# Altium PCB CPJ.PcbDoc (part 1 of 2)
Units mm, origin at the board's own origin, x right, y up, seen from the top; angles counter-clockwise.
Board outline 210 x 60 mm, 4 copper layers (Top Layer, Inner_1, PWR_SIG, Bottom Layer), stack 1.63 mm thick; 123 components, 76 nets, 368 pads, 236 vias.
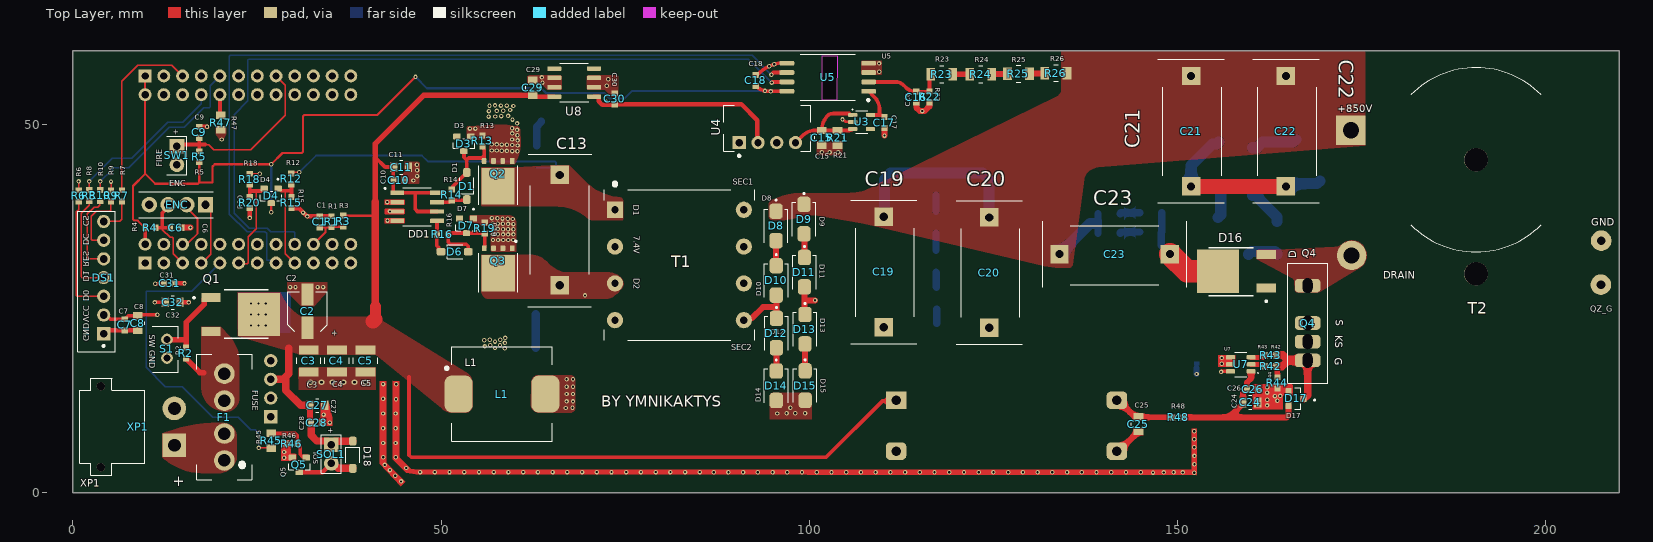
[diagram p0: Top Layer view]
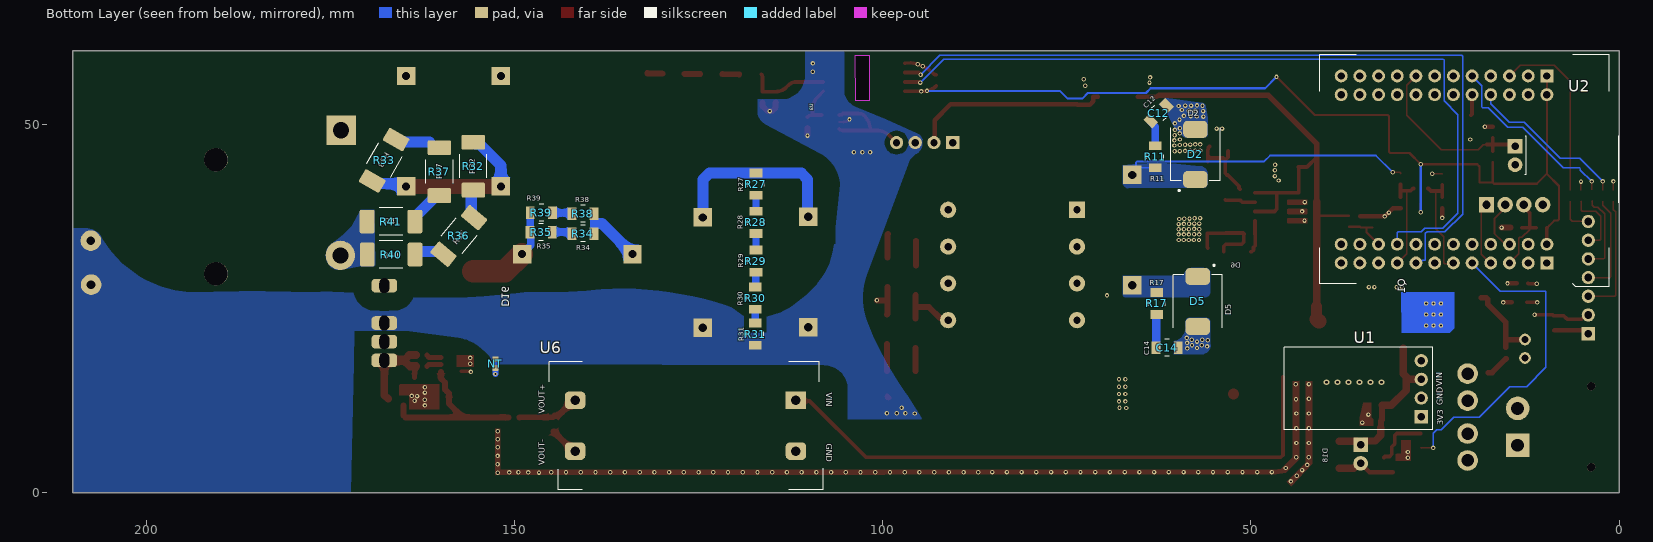
[diagram p1: Bottom Layer view, seen from below]
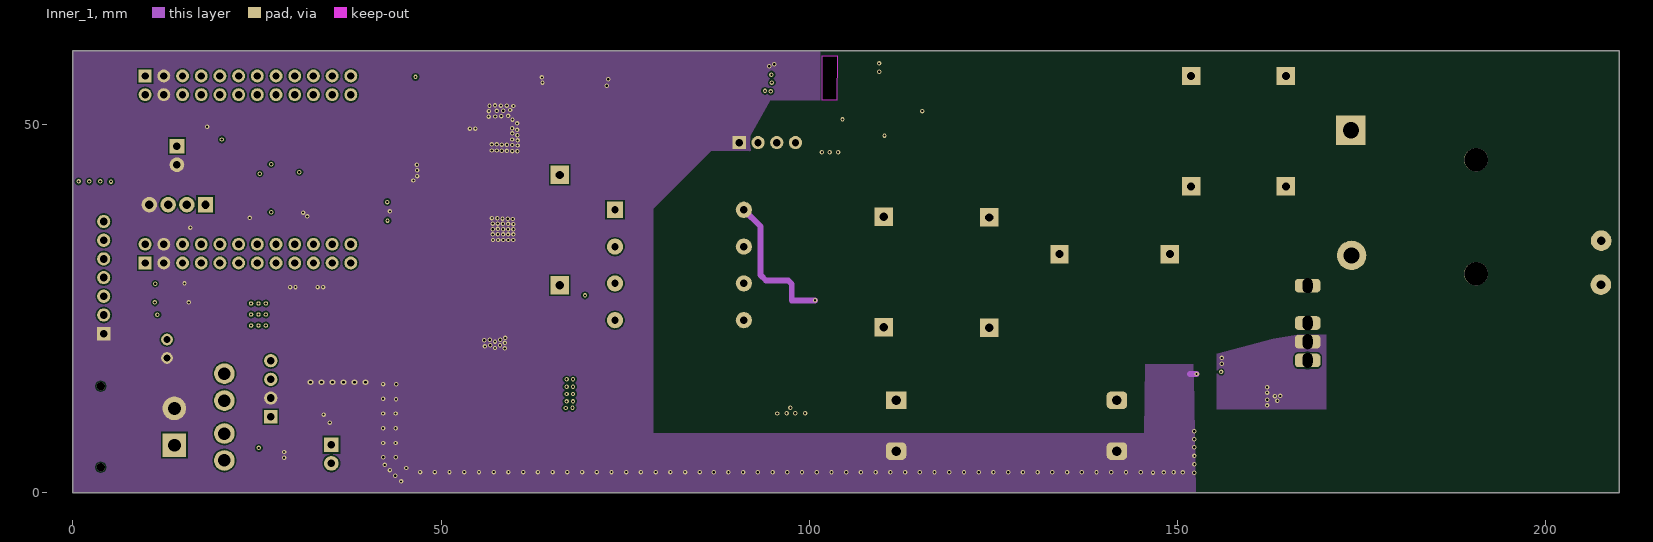
[diagram p2: Inner_1]
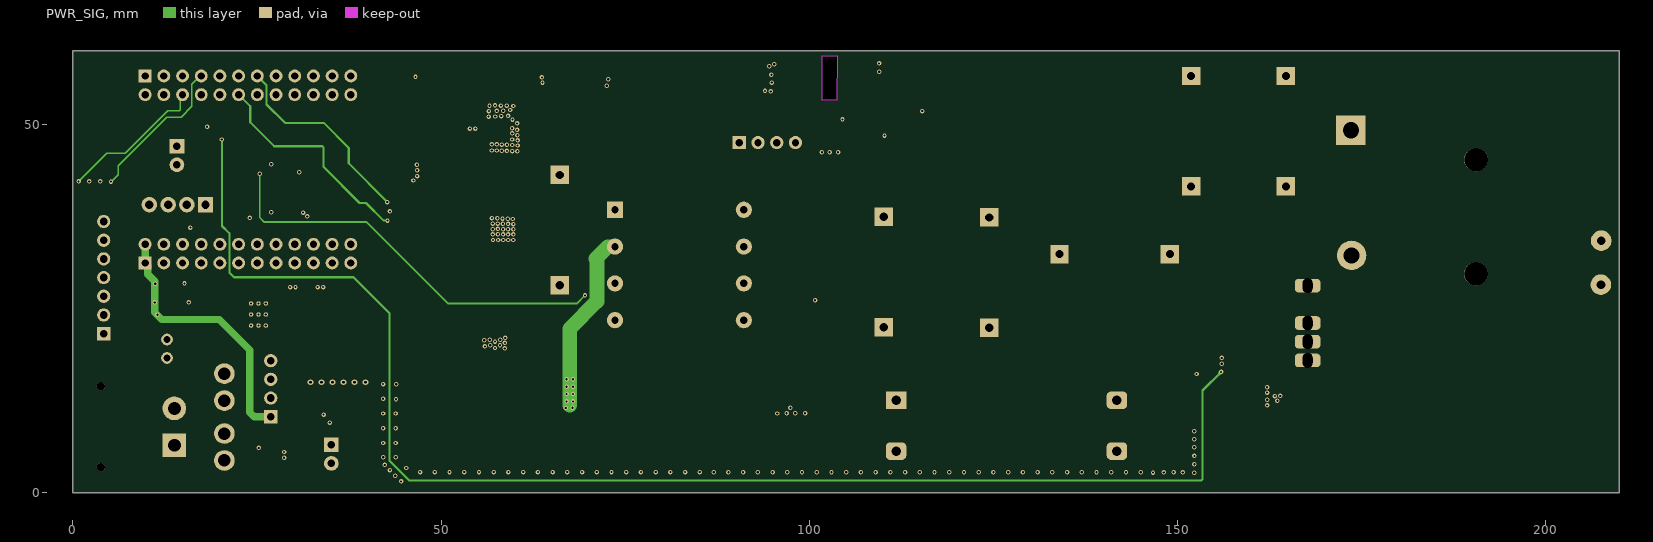
[diagram p3: PWR_SIG]
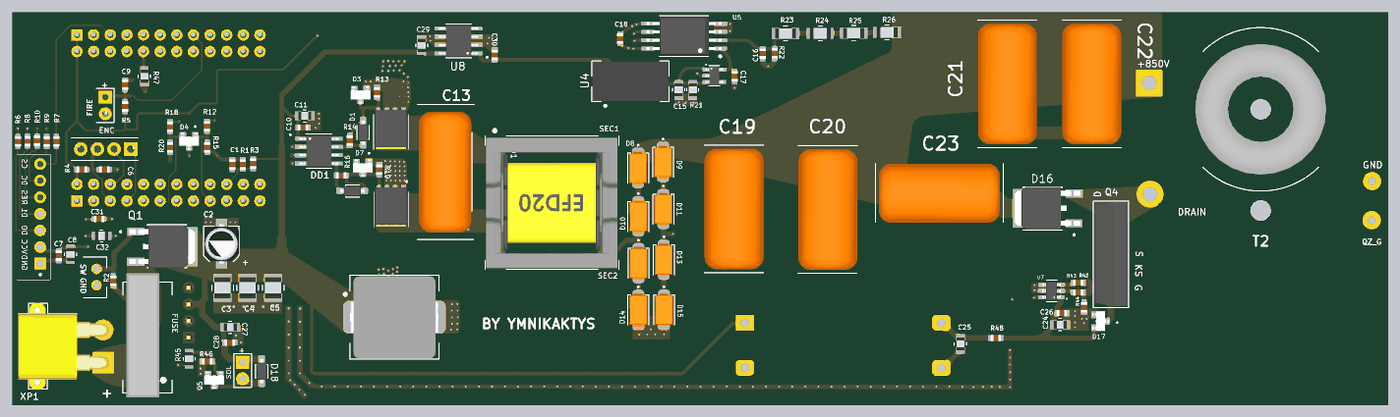
[diagram p5: 3D render of the assembled board from above, using the file's embedded part models]
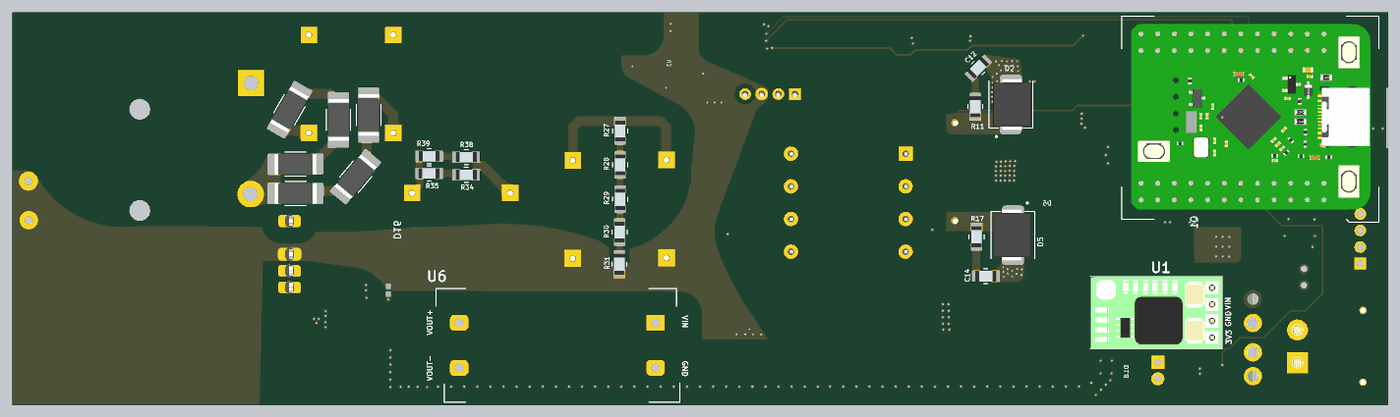
[diagram p6: 3D render of the assembled board from below, using the file's embedded part models]

## Layer stack, top to bottom
Top Solder: solder mask 0.0102, Solder Resist, Dk 3.5
Top Layer: signal copper 0.0356
Dielectric 1: prepreg 0.2108, PP-006, Dk 4.1
Inner_1: signal copper 0.035
Dielectric 2: dielectric 1.0668, FR-4, Dk 4.8
PWR_SIG: signal copper 0.035
Dielectric 3: prepreg 0.2108, PP-006, Dk 4.1
Bottom Layer: signal copper 0.0356
Bottom Solder: solder mask 0.0102, Solder Resist, Dk 3.5

## Board outline
0,0 210,0 210,60 0,60
cut-out: 101.76,59.375 103.805,59.375 103.748,53.325 101.76,53.325

## Design rules (kind name [scope] priority, off if disabled: settings)
Clearance Clearance_REST_TO_HVGND [InNet('NetR30_1') or InComponent('U4') vs InNet('HV_GND')] p1: gap=0.7 ignorepadtopadclearanceinfootprint=FALSE
Clearance Clearance_HV_Pulse_7kV [InNet('HV_OUT')] p2: gap=8 ignorepadtopadclearanceinfootprint=TRUE
Clearance Clearance_HV_Divider [InComponent('R23') Or InComponent('R24') Or InComponent('R25') Or InComponent('R26') vs InComponent('R23') Or InComponent('R24') Or InComponent('R25') Or InComponent('R26')] p3: gap=0.8 ignorepadtopadclearanceinfootprint=FALSE
Clearance Clearance_SiC_Gate_Loop [InNet('SIC_GATE') vs InNet('VBAT') OR InNet('VBAT_SW') OR InNet('ZVS_DRAIN1') OR InNet('ZVS_DRAIN2')] p4: gap=1.5 ignorepadtopadclearanceinfootprint=FALSE
Clearance Clearance_HV_DC_Internal [InNet('HV_BUS') OR InNet('SIC_DRAIN') vs InNet('HV_GND') OR (InPolygon AND NOT InNet('HV_BUS'))] p5: gap=2.5 ignorepadtopadclearanceinfootprint=FALSE
Clearance Clearance_HV_to_LV_Barrier [InNet('GND') OR InNet('VBAT_RAW') OR InNet('VBAT_SW') vs InNet('HV_BUS') OR InNet('SIC_DRAIN')] p6: gap=6 ignorepadtopadclearanceinfootprint=TRUE
Clearance [All] p7: gap=0.2 ignorepadtopadclearanceinfootprint=TRUE
ComponentClearance [All] p1: gap=0.1 collisioncheckmode=3 verticalgap=0.1 showdistances=TRUE
HoleSize [All] p1: absolutevalues=TRUE maxlimit=3.5 minlimit=0.025 maxpercent=80.000 minpercent=20.000
MinimumSolderMaskSliver [All] p1: minsoldermaskwidth=0.1
PolygonConnect PolygonConnect_Direct [InNet('HV_BUS') OR InNet('HV_GND') OR InNet('SIC_DRAIN') OR InNet('ZVS_DRAIN1') OR InNet('ZVS_DRAIN2') OR InNet('VBAT') OR InNet('VBAT_SW') OR InNet('SIC_KELVIN') OR InNet('SIC_GATE')] p1: connectstyle=Direct reliefconductorwidth=0.254 reliefentries=4 polygonreliefangle="90 Angle" airgapwidth=0.254
PolygonConnect PolygonConnect_Thermal [IsThruPin] p2: connectstyle=Relief reliefconductorwidth=0.5 reliefentries=4 polygonreliefangle="90 Angle" airgapwidth=0.3
PolygonConnect [All] p3: connectstyle=Relief reliefconductorwidth=0.254 reliefentries=4 polygonreliefangle="90 Angle" airgapwidth=0.254
RoutingVias RoutingVias_Power [InNetClass('PWR_BAT') or InNet('GND') or InNet('HV_GND')] p1: holewidth=0.4 width=0.8 viastyle="Through Hole" minholewidth=0.3 minwidth=0.6 maxholewidth=0.5 maxwidth=1
RoutingVias [All] p2: holewidth=0.3 width=0.5 viastyle="Through Hole" minholewidth=0.3 minwidth=0.5 maxholewidth=0.5 maxwidth=0.8
ShortCircuit [InComponent('NT*')] p1: allowed=TRUE
SilkToSolderMaskClearance [IsPad] p1: minsilkscreentomaskgap=0.15 clearancetoexposedcopper=TRUE
SolderMaskExpansion [All] p1: expansion=0.05 istentingtop=FALSE
SupplyNets "Schematic Supply Nets_4" [InNet('+3V3')] p1: voltage=0.000
SupplyNets "Schematic Supply Nets_3" [InNet('VBAT_SW')] p2: voltage=0.000
SupplyNets "Schematic Supply Nets_2" [InNet('HV_GND')] p3: voltage=0.000
SupplyNets "Schematic Supply Nets_1" [InNet('GND')] p4: voltage=0.000
SupplyNets "Schematic Supply Nets" [InNet('HV_BUS')] p5: voltage=0.000
Width Width_SiC_Gate [InNetClass('SIC_GATE')] p1: maxlimit=1.2 minlimit=0.4 preferedwidth=0.6
Width Width_3V3_Logic_PWR [InNet('+3V3') or InNet('+15V_SIC')] p2: maxlimit=1 minlimit=0.3 preferedwidth=0.5
Width Width_ZVS_Resonant [InNetClass('ZVS_RESONANT')] p3: maxlimit=15 minlimit=3 preferedwidth=4.5
Width Width_PWR_Battery [InNetClass('PWR_BAT')] p4: maxlimit=5 minlimit=2 preferedwidth=3
Width [All] p5: maxlimit=10 minlimit=0.15 preferedwidth=1
25 further rules are at their usual default settings.

## Classes and differential pairs
component class 06_Pneumatics: C27 C28 D18 Q5 R45 R46 SOL1
component class 05_SiC_Nanosecond_Stage: C21 C22 C23 C24 C25 C26 D16 D17 NT Q4 R32 R33 R34 R35 R36 R37 R38 R39 R40 R41 R42 R43 R44 R47 R48 T2 U6 U7
component class 04_HV_Bus_Sense: C15 C16 C17 C18 C19 C20 C29 C30 D8 D9 D10 D11 D12 D13 D14 D15 R21 R22 R23 R24 R25 R26 R27 R28 R29 R30 R31 U3 U4 U5 U8
component class 03_ZVS_PushPull: C10 C11 C12 C13 C14 D1 D2 D3 D4 D5 D6 D7 DD1 L1 Q2 Q3 R11 R12 R13 R14 R15 R16 R17 R18 R19 R20 T1
component class 02_MCU_Control_UI: C6 C7 C8 C9 C31 C32 DS1 ENC R4 R5 R6 R7 R8 R9 R10 SW1 U2
component class 01_Power_Input: C1 C2 C3 C4 C5 F1 Q1 R1 R2 R3 S1 U1 XP1

## Components (designator, comment, footprint, x,y, rotation, side; value= is the part's Value field where it differs from the comment)
C1 "100nF" CHIP_0603_SMD 33.525,36.775 r90 top
C2 "100uF 16V" CAP_ALU_SMD_D5.0_L5.4 31.85,24.6 r90 top
C3 "22uF 25V" CHIP_1210_3225 32.025,17.9 r90 top
C4 "22uF 25V" CHIP_1210_3225 35.85,17.9 r90 top
C5 "22uF 25V" CHIP_1210_3225 39.75,17.9 r90 top
C6 "100nF" CHIP_0603_SMD 13.975,36 r180 top
C7 "100nF" CHIP_0603_SMD 7.025,22.8 r270 top
C8 "10uF" CHIP_0805_SMD 8.8,23.025 r270 top
C9 "100nF" CHIP_0603_SMD 17.15,48.95 r270 top
C10 "100nF" CHIP_0603_SMD 44.275,42.425 r180 top
C11 "2.2uF 25V" CHIP_0805_SMD 44.575,44.225 r180 top
C12 "2.2nF 100V" CHIP_1206_SMD 62.55,51.55 r315 bottom
C13 "220nF 100V" CAP_FILM_P15.0_CBB22_W8.5_MKP 66.125,35.675 r90 top
C14 "2.2nF 100V" CHIP_1206_SMD 61.375,19.675 r0 bottom
C15 "4.7uF 16V" CHIP_0805_SMD 101.7,48.2 r90 top
C16 "1nF 50V NP0" CHIP_0603_SMD 114.525,53.725 r270 top
C17 "100nF" CHIP_0603_SMD 110.225,50.275 r90 top
C18 "100nF" CHIP_0603_SMD 92.75,56 r270 top
C19 "1nF 2000V" CAP_FILM_P15.0_CBB81_HEAVY_DUTY 110.125,29.975 r90 top
C20 "1nF 2000V" CAP_FILM_P15.0_CBB81_HEAVY_DUTY 124.45,29.9 r90 top
C21 "470pF 2kV" CAP_FILM_P15.0_CBB81_HEAVY_DUTY 151.875,49.1 r90 top
C22 "330pF 2kV" CAP_FILM_P15.0_CBB81_HEAVY_DUTY 164.75,49.1 r90 top
C23 "3.3nF 2000V" CAP_FILM_P15.0_CBB81_HEAVY_DUTY 141.5,32.4 r0 top
C24 "2.2uF 25V" CHIP_0805_SMD 159.925,12.25 r0 top
C25 "10uF" CHIP_0805_SMD 144.725,9.325 r90 top
C26 "100nF" CHIP_0603_SMD 160.225,14.025 r0 top
C27 "10uF" CHIP_0805_SMD 33.2,11.875 r180 top
C28 "100nF" CHIP_0603_SMD 33.1,9.5 r180 top
C29 "2.2uF 25V" CHIP_0805_SMD 62.425,55 r270 top
C30 "100nF" CHIP_0603_SMD 73.6,53.5 r270 top
C31 "100nF" CHIP_0603_SMD 13.125,28.425 r180 top
C32 "10uF" CHIP_0805_SMD 13.55,25.85 r180 top
D1 "1N5819HW" SOD-123_2P_SMD 53.5,41.65 r90 top
D2 "39V 1.5kW" DIODE_DO-214AB_SMC 57.55,45.95 r90 bottom
D3 "BZX84-C15" SOT-23_3P_SMD 53.1,47.4 r180 top
D4 "BAT54C" SOT-23_3P_SMD 26.925,40.325 r180 top
D5 "39V 1.5kW" DIODE_DO-214AB_SMC 57.225,25.975 r270 bottom
D6 "1N5819HW" SOD-123_2P_SMD 51.85,32.725 r0 top
D7 "BZX84-C15" SOT-23_3P_SMD 53.45,36.25 r180 top
D8 "US2M" DIODE_DO-214AC_SMA 95.5,36.225 r270 top
D9 "US2M" DIODE_DO-214AC_SMA 99.3,37.15 r270 top
D10 "US2M" DIODE_DO-214AC_SMA 95.525,28.825 r270 top
D11 "US2M" DIODE_DO-214AC_SMA 99.35,29.95 r270 top
D12 "US2M" DIODE_DO-214AC_SMA 95.55,21.675 r270 top
D13 "US2M" DIODE_DO-214AC_SMA 99.425,22.2 r270 top
D14 "US2M" DIODE_DO-214AC_SMA 95.525,14.525 r270 top
D15 "US2M" DIODE_DO-214AC_SMA 99.45,14.55 r270 top
D16 "C4D02120E" TO-252-2L_DPAK_THERMAL#1 158.025,30.075 r90 top
D17 "BAT54S" SOT-23_3P_SMD 166.125,12.8 r270 top
D18 "1N5819HW" SOD-123_2P_SMD 38.025,5.15 r270 top
DD1 "UCC27524DR" SOIC-8_1.27_4.9x3.9mm 46.75,38.825 r0 top
DS1 "OLED_0.96_SPI_7PIN" DISP_OLED_0.96_SSD1306_SPI_7PIN_THT 4.175,29.215 r90 top
ENC "EC11" ENC_EC11_VERTICAL_THT 12.925,39.125 r180 top
F1 "20A 32V" FUSE_HOLDER_MINI_KEYSTONE_3544 20.575,10.275 r90 top
L1 "22uH 12A" IND_SRP1265A_13.5x12.5_HANDSOLDER 58.275,13.4 r0 top
NT "net_tie" NET_TIE_SMD 152.625,17.525 r270 bottom net-tie
Q1 "AOD4185" TO-252-2L_DPAK_THERMAL#2 22.8,24.2 r270 top
Q2 "CSD18534Q5A" SON-8_5x6_CSD18534Q5A_THERMAL 57.75,42.3 r90 top
Q3 "CSD18534Q5A" SON-8_5x6_CSD18534Q5A_THERMAL 57.76,30.45 r90 top
Q4 "C3M0075120K" TO-247-4_WOLFSPEED_SLOTTED_VERT 167.7,23.045 r270 top
Q5 "AO3400A" SOT-23_3P_SMD 30.75,3.775 r180 top
R1 "47.5k" CHIP_0603_SMD 35.125,36.8 r90 top
R2 "100k" CHIP_0603_SMD 15.35,18.95 r270 top
R3 "100k" CHIP_0603_SMD 36.7,36.875 r270 top
R4 "10k" CHIP_0603_SMD 10.5,36 r180 top
R5 "10k" CHIP_0603_SMD 17.15,45.625 r270 top
R6 "33R" CHIP_0603_SMD 0.775,40.325 r90 top
R7 "33R" CHIP_0603_SMD 6.65,40.325 r90 top
R8 "33R" CHIP_0603_SMD 2.225,40.35 r90 top
R9 "33R" CHIP_0603_SMD 5.175,40.3 r90 top
R10 "33R" CHIP_0603_SMD 3.7,40.375 r270 top
R11 "5.62" CHIP_1206_SMD 62.975,45.625 r270 bottom
R12 "10k" CHIP_0603_SMD 29.65,42.625 r90 top
R13 "10k" CHIP_0603_SMD 55.625,47.775 r270 top
R14 "4.7" CHIP_0603_SMD 51.45,40.45 r90 top
R15 "1k" CHIP_0603_SMD 29.675,39.4 r90 top
R16 "4.7" CHIP_0603_SMD 50.175,35.1 r0 top
R17 "5.62" CHIP_1206_SMD 62.775,25.7 r90 bottom
R18 "10k" CHIP_0603_SMD 24.025,42.575 r90 top
R19 "10k" CHIP_0603_SMD 55.95,35.95 r270 top
R20 "1k" CHIP_0603_SMD 24.025,39.4 r90 top
R21 "300" CHIP_0805_SMD 103.85,48.2 r90 top
R22 "3.9k" CHIP_0603_SMD 116.35,53.75 r270 top
R23 "510k" CHIP_1206_SMD 118,56.825 r180 top
R24 "510k" CHIP_1206_SMD 123.3,56.85 r180 top
R25 "510k" CHIP_1206_SMD 128.425,56.9 r180 top
R26 "510k" CHIP_1206_SMD 133.5,57 r180 top
R27 "3.9M" CHIP_1206_SMD 117.225,41.9 r90 bottom
R28 "3.9M" CHIP_1206_SMD 117.225,36.725 r90 bottom
R29 "3.9M" CHIP_1206_SMD 117.225,31.45 r90 bottom
R30 "3.9M" CHIP_1206_SMD 117.3,26.425 r90 bottom
R31 "3.9M" CHIP_1206_SMD 117.325,21.525 r90 bottom
R32 "12R" RES_2512_6.3x3.2_HANDSOLDER 155.625,44.35 r90 bottom
R33 "12R" RES_2512_6.3x3.2_HANDSOLDER 167.725,45.15 r300 bottom
R34 "4.7k" CHIP_1206_SMD 140.725,35.2 r0 bottom
R35 "4.7k" CHIP_1206_SMD 146.4,35.4 r0 bottom
R36 "12R" RES_2512_6.3x3.2_HANDSOLDER 157.6,34.875 r130 bottom
R37 "12R" RES_2512_6.3x3.2_HANDSOLDER 160.225,43.6 r90 bottom
R38 "4.7k" CHIP_1206_SMD 140.725,37.9 r0 bottom
R39 "4.7k" CHIP_1206_SMD 146.375,38.025 r0 bottom
R40 "12R" RES_2512_6.3x3.2_HANDSOLDER 166.775,32.35 r180 bottom
R41 "12R" RES_2512_6.3x3.2_HANDSOLDER 166.8,36.825 r180 bottom
R42 "4.7" CHIP_0603_SMD 162.675,17.175 r180 top
R43 "1k" CHIP_0603_SMD 162.675,18.675 r180 top
R44 "10k" CHIP_0603_SMD 163.6,14.925 r90 top
R45 "110R" CHIP_0805_SMD 26.925,7.05 r270 top
R46 "10k" CHIP_0603_SMD 29.725,6.65 r0 top
R47 "110R" CHIP_0805_SMD 20.1,50.275 r90 top
R48 "4.7" CHIP_0603_SMD 150.1,10.225 r180 top
S1 "SW_PWR" TNT_SW_SLIDE_2.5mm 12.775,20.8 r270 top
SOL1 "0520D (6V)" PAD_2P_THT_P2.54MM 35.1,5.25 r270 top
SW1 "KEY_FIRE" PAD_WIRE_2P_STRAIN_P2.54 14.125,45.8 r270 top
T1 "EFD20" TRANS_EFD20_CORETECH_BH-EFD20-1-8R_THT 82.375,30.925 r0 top
T2 "T2 (Epcos N87)" TRANS_AUTOTRANS_T2_EPCOS_R20_N87 190.575,45.225 r0 top locked
U1 "MP2315 (3.3V)" MODULE_DC-DC_MP2315_MINI_BUCK_THT 26.875,14.12 r0 bottom
U2 "WeAct_STM32G474CEU6" MODULE_WEACT_STM32G474CEU6_DIP 20.975,43.9 r0 bottom
U3 "ME6211C50M5G" SOT-23-5_M5_HANDSOLDER 107.125,50.35 r270 top
U4 "B0505S-1WR3" CONV_DC-DC_MORNSUN_SIP-4_11.6x6.0 94.325,49.5 r0 top
U5 "AMC1311" SOIC-8-DWV_WIDE_HANDSOLDER 102.525,56.425 r180 top
U6 "Step-Up 15V" MODULE_DC-DC_MT3608_BOOST_THT 126.8,9.1 r180 bottom
U7 "UCC27511" SOT-23-6_DBV_HANDSOLDER 158.625,17.425 r180 top
U8 "LM78L05" SOIC-8_1.27_4.9x3.9mm 68.075,55.7 r180 top
XP1 "7.4V_IN" CONN_XT30PW-M_2P 3.775,8.95 r90 top

## Footprints (in the part's own frame and the unit in brackets; to place one, negate y for a bottom-side part, rotate by r counter-clockwise, add the part's x,y. Pads: shape width x height; smd on the part's side, far side on the other; paste and mask are expansions set on the pad)
CAP_ALU_SMD_D5.0_L5.4 [mm] "SMD Aluminum Electrolytic Capacitor, Dia 5.0mm, Length 5.4mm, Base 5.3x5.3mm, 100uF 16V, Pitch 4.4mm (Hand Solder)"
  rect 3x1.6 smd mask+0.05: 1(-2.2,0) 2(2.3,-0.025)
  silkscreen extent -2.7,-2.7 2.73,2.7, body extent -3,-2.65 3,2.65, height 5.8
CAP_FILM_P15.0_CBB22_W8.5_MKP [mm] "Film Capacitor Metallized  (MKP/CBB22), Pitch 15mm, Body 18.0x8.5x14.0mm, ZVS Resonant Tank"
  rect 2.5x2.5 hole 1.1 mask+0.05: 1(-7.5,0) 2(7.5,0)
  silkscreen extent -10.4,-4.32 10.28,4.35, body extent -9.33,-3.9 9.17,4.1, height 18
CAP_FILM_P15.0_CBB81_HEAVY_DUTY [mm] "Radial Film Capacitor (Dipped Epoxy/Pillow Type). Pitch: 15.0mm. Optimized for CBB81"
  rect 2.5x2.5 hole 1.1 mask+0.05: 1(-7.5,0) 2(7.5,0)
  silkscreen extent -9.75,-4.5 9.75,4.5, body extent -9.25,-4.53 9.25,4.48, height 19
CHIP_0603_SMD [mm] "Chip Component 0603 (1608 Metric), Hand Soldering Extended Pads (0.8x0.85mm, Pitch 1.5mm), IPC-7351"
  rect 0.8x0.85 smd mask+0.05: 1(-0.75,0) 2(0.75,0)
  body extent -0.83,-0.48 0.77,0.47, height 0.8
CHIP_0805_SMD [mm] "Chip Component 0805 (2012 Metric), IPC-7351 Level B (Nominal), Pad 1.0x1.3mm, Pitch 2.0mm"
  rect 1x1.3 smd mask+0.05: 1(-1,0) 2(1,0)
  silkscreen extent -0.2,-0.9 0.2,0.95, body extent -1,-0.63 1,0.63, height 1.22
CHIP_1206_SMD [mm] "Chip Component 1206 (3216 Metric), IPC-7351 Level B (Nominal), Pad 1.2x1.7mm, Pitch 3.0mm"
  rect 1.2x1.7 smd mask+0.05: 1(-1.5,0) 2(1.5,0)
  silkscreen extent -0.3,-1.15 0.3,1.15, body extent -1.6,-0.8 1.6,0.8, height 0.8
CHIP_1210_3225 [mm] "Chip Component 1210 (3225 Metric), IPC-7351 Level B (Nominal), Pad 1.2x2.7mm, Pitch 3.0mm"
  rect 1.2x2.7 smd mask+0.05: 1(-1.5,0) 2(1.5,0)
  silkscreen extent -0.4,-1.65 0.4,1.65, body extent -1.6,-1.25 1.6,1.25, height 1.22
CONN_XT30PW-M_2P [mm] "DC Power Connector, Male 90° (Right Angle) PCB Mount, 2-Pin, Pitch 5.0mm, 30A Cont. / 50A Peak, with Locating Pins, Amass XT30PW-M"
  rect 3.2x3.2 hole 1.75 mask+0.05: 1(-2.5,-10)
  round 3.2 hole 1.75 mask+0.05: 2(2.5,-10)
  round 1.1 hole 1.1 unplated mask+0.05: ""(-5.5,0) ""(5.5,0)
  silkscreen extent -6.58,-6 6.58,2.88, body extent -6.65,-11 6.65,2.95, height 5
CONV_DC-DC_MORNSUN_SIP-4_11.6x6.0 [mm] "Isolated DC-DC Converter 1W, SIP-4 Package, Mornsun B_S-1WR3 / E_S-1WR3 Series, Body 11.60x6.00x10.16mm, Pitch 2.54mm, 3kV Isolation"
  rect 1.8x1.8 hole 1 mask+0.05: 1(-3.81,-1.95)
  round 1.8 hole 1 mask+0.05: 2(-1.27,-1.95) 3(1.27,-1.95) 4(3.81,-1.95)
  silkscreen extent -5.9,-3.8 5.9,3.1, body extent -5.8,-3 5.8,2.99, height 10.66
DIODE_DO-214AB_SMC [mm] "DO-214AB (SMC) Surface Mount Diode, 2-Lead, Body 7.0x6.0mm, Total Span 8.0mm, IPC-7351 Nominal"
  rrect50% 2.3x3.3 smd mask+0.05: 1(-3.4,0) 2(3.4,0)
  silkscreen extent -4.92,-3.35 3.6,3.35, body extent -3.95,-3.1 3.95,2.7, height 2.23
DIODE_DO-214AC_SMA [mm] "DO-214AC (SMA) Surface Mount Diode, 2-Lead, Body 4.6x2.8mm, Total Span 5.6mm, IPC-7351 Nominal"
  rrect50% 2.1x1.8 smd mask+0.05: 1(-2,0) 2(2,0)
  silkscreen extent -3.52,-1.6 2.3,1.6, body extent -2.5,-1.35 2.55,1.35, height 2.17
DISP_OLED_0.96_SSD1306_SPI_7PIN_THT [mm] "0.96 inch OLED Display Module, SSD1306, 128x64, 7-Pin 2.54mm SPI Header, 4x M2 Mounting Holes (23.3x23.8mm Pitch), Body 27.30x27.80mm"
  rect 1.8x1.8 hole 1.05 mask+0.05: 1(-7.62,0)
  round 1.8 hole 1.05 mask+0.05: 2(-5.08,0) 3(-2.54,0) 4(0,0) 5(2.54,0) 6(5.08,0) 7(7.62,0)
  silkscreen extent -10.1,-1.55 9.03,3.5
ENC_EC11_VERTICAL_THT [mm] "Rotary Encoder EC11 with Push Switch, Vertical THT, Body 11.8x14.5mm, Bushing M7x0.75, 2x Side Mounting Brackets"
  rect 2.1x2.1 hole 1.15 mask+0.05: A(-5.08,0)
  round 2.1 hole 1.15 mask+0.05: B(-2.54,0) C(2.54,0) D(0,0)
  silkscreen extent -6.15,-1.75 4,1.75
FUSE_HOLDER_MINI_KEYSTONE_3544 [mm] "Mini Automotive Blade Fuse Clip Assembly, Keystone 3544, 4-Pin In-Line THT, Hole D=1.7mm, Body 14.68x4.75mm, Dual-Pin per Terminal for 20-30A"
  round 2.8 hole 1.7 mask+0.05: 1(-5.9,0) 1(-2.24,0) 2(2.24,0) 2(5.9,0)
  silkscreen extent -8.5,-3.77 8.5,3.77, body extent -9.15,-1.78 9.85,3.22, height 20.2
IND_SRP1265A_13.5x12.5_HANDSOLDER [mm] "Shielded Power Inductor, Body 13.5x12.5x6.2mm, Bourns SRP1265A Series, Extended Pads (3.8x5.0mm, 8.0mm Gap) for Manual Soldering"
  rrect50% 3.8x5 smd mask+0.05: 1(-5.9,0) 2(5.9,0)
  silkscreen extent -7.58,-6.4 6.8,6.4, body extent -6.75,-6.25 6.75,6.25, height 6.5
MODULE_DC-DC_MP2315_MINI_BUCK_THT [mm] "Mini MP2315 Step-Down Buck Converter Module, 4-Pin 2.54mm Pitch Header (VO+, GND, IN+, EN), Board Size 20x11mm, Sub-Board PCB Mount"
  rect 1.8x1.8 hole 1.05 mask+0.05: 1(0,3.81)
  round 1.8 hole 1.05 mask+0.05: 2(0,1.27) 3(0,-1.27) 4(0,-3.81)
  silkscreen extent -1.6,-5.6 18.6,5.6, body extent -1.55,-5.48 18.45,5.53, height 7.59
MODULE_DC-DC_MT3608_BOOST_THT [mm] "MT3608 Step-Up Boost Converter Module, 36x17x7mm, 4-Pin Corner Mount (VIN+, VIN-, VOUT+, VOUT-), Pitch 31.0x13.5mm, Preset to 15V"
  rect 2.8x2.4 hole 1.3 mask+0.05: 1(15,3.45)
  rrect50% 2.8x2.4 hole 1.3 mask+0.05: 2(15,-3.45) 3(-15,3.45) 4(-15,-3.45)
  silkscreen extent -18.5,-8.7 18.7,8.7
MODULE_WEACT_STM32G474CEU6_DIP [mm] "WeAct Studio STM32G474CEU6 Core Board, 36.28x28.14mm, 4x12 Pin Headers Pitch 2.54mm (Row Dist 20.32/25.4mm) + 4-Pin SWD, Mapped to Custom Schematic Pins"
  rect 1.75x1.75 hole 1 mask+0.05: 1(-11.17,-12.7) 25(-11.17,12.7)
  round 1.75 hole 1 mask+0.05: 2(-11.17,-10.16) 3(-8.63,-12.7) 4(-8.63,-10.16) 5(-6.09,-12.7) 6(-6.09,-10.16) 7(-3.55,-12.7) 8(-3.55,-10.16) 9(-1.01,-12.7) 10(-1.01,-10.16) 11(1.53,-12.7) 12(1.53,-10.16) 13(4.07,-12.7) 14(4.07,-10.16) 15(6.61,-12.7) 16(6.61,-10.16) 17(9.15,-12.7) 18(9.15,-10.16) 19(11.69,-12.7) 20(11.69,-10.16) 21(14.23,-12.7) 22(14.23,-10.16) 23(16.77,-12.7) 24(16.77,-10.16) 26(-11.17,10.16) 27(-8.63,12.7) 28(-8.63,10.16) 29(-6.09,12.7) 30(-6.09,10.16) 31(-3.55,12.7) 32(-3.55,10.16) 33(-1.01,12.7) 34(-1.01,10.16) 35(1.53,12.7) 36(1.53,10.16) 37(4.07,12.7) 38(4.07,10.16) 39(6.61,12.7) 40(6.61,10.16) 41(9.15,12.7) 42(9.15,10.16) 43(11.69,12.7) 44(11.69,10.16) 45(14.23,12.7) 46(14.23,10.16) 47(16.77,12.7) 48(16.77,10.16)
  silkscreen extent -20.9,-15.55 19.65,15.93, body extent -18.34,-14.35 18.19,14.05, height 7.25
NET_TIE_SMD [mm]
  rrect20% 0.8x0.8 smd mask+0: 1(-0.6,0) 2(0.6,0)
  Top Layer region: -0.225,0.325 0.225,0.325 0.225,-0.325 -0.225,-0.325
PAD_2P_THT_P2.54MM [mm]
  rect 2x2 hole 1 mask+0.05: 1(-1.27,0)
  round 2 hole 1 mask+0.05: 2(1.27,0)
  silkscreen extent -2.6,-1.35 2.6,1.35, body extent -2.68,-1.43 2.68,1.43, height 3
PAD_WIRE_2P_STRAIN_P2.54 [mm]
  rect 2x2 hole 1 mask+0.05: 1(-1.27,0)
  round 2 hole 1 mask+0.05: 2(1.27,0)
  silkscreen extent -2.6,-1.35 2.6,1.35, body extent -2.68,-1.43 2.68,1.43, height 3
RES_2512_6.3x3.2_HANDSOLDER [mm] "Resistor SMD 2512 (Metric 6432), 1W, Extended Pads (2.00x3.20mm, 4.5mm Gap, 8.5mm Span) for Manual Soldering, Pulse Snubber"
  rrect20% 2x3.2 smd mask+0.05: 1(-3.25,0) 2(3.25,0)
  silkscreen extent -1.6,-1.85 1.6,1.85, body extent -3.17,-1.58 3.17,1.58, height 0.7
SOD-123_2P_SMD [mm] "SOD-123 Surface Mount Diode, 2-Lead, Body 2.7x1.6mm, Total Length 3.7mm, IPC-7351"
  rrect50% 1.2x1 smd mask+0.05: 1(-1.85,0) 2(1.85,0)
  silkscreen extent -1.02,-0.95 1.1,0.95, body extent -1.83,-0.77 1.83,0.77, height 1.55
SOIC-8-DWV_WIDE_HANDSOLDER [mm] "SOIC-8 Wide Body (TI DWV0008A), 8-Lead, Pitch 1.27mm, Body 7.5x5.85mm, 9.1mm Creepage/Clearance, Extended Pads (2.0x0.65mm) for Manual Soldering, AMC1311"
  rrect50% 2x0.65 smd mask+0.05: 1(-5.55,1.905) 2(-5.55,0.635) 3(-5.55,-0.636) 4(-5.55,-1.905) 5(5.55,-1.905) 6(5.55,-0.635) 7(5.55,0.635) 8(5.55,1.905)
  silkscreen extent -5.65,-3.1 3.75,3.25, body extent -5.75,-2.93 5.75,2.93, height 2.8
SOIC-8_1.27_4.9x3.9mm [mm] "SOIC-8 Surface Mount IC, 8-Lead, Pitch 1.27mm, Body 4.90x3.90mm, Span 6.00mm (TI D-Package)"
  rrect25% 1.9x0.6 smd paste+0 mask+0.05: 1(-2.7,1.905) 2(-2.7,0.635) 3(-2.7,-0.635) 4(-2.7,-1.905) 5(2.7,-1.905) 6(2.7,-0.635) 7(2.7,0.635) 8(2.7,1.905)
  silkscreen extent -4.45,-2.6 1.95,2.6, body extent -3,-2.45 3,2.45, height 1.75
SON-8_5x6_CSD18534Q5A_THERMAL [mm] "N-Channel Power MOSFET, SON 5x6mm (TI Q5A Package), Monolithic Drain Thermal Pad (4.95x4.50mm) with 2x2 Stencil Array & Thermal Vias, CSD18534Q5A"
  rect 0.8x0.65 smd mask+0.05: 1(2.75,-1.905)
  rrect50% 0.8x0.65 smd mask+0.05: 1(2.75,-0.635) 1(2.75,0.635) 2(2.75,1.905)
  rect 4.95x4.5 smd paste-5 mask+0.05: 3(-0.65,0)
  silkscreen extent -3.2,-2.65 2.1,2.65, body extent -3,-2.45 3,2.45, height 1.1
SOT-23-5_M5_HANDSOLDER [mm] "SOT-23-5 (TO-236-5), 5-Lead, Pitch 0.95mm, Extended Pads (1.25x0.60mm) for Manual Soldering, Body 2.90x1.60mm, ME6211"
  rrect50% 0.6x1.25 smd mask+0.04: 1(-0.95,-1.2) 2(0,-1.2) 3(0.95,-1.2) 4(0.95,1.2) 5(-0.95,1.2)
  silkscreen extent -1.76,-1.29 1.55,0.8, body extent -1.45,-1.35 1.45,1.35, height 1.45
SOT-23-6_DBV_HANDSOLDER [mm] "SOT-23-6 (TI DBV0006A), 6-Lead, Pitch 0.95mm, Extended Pads (1.25x0.60mm) for Manual Soldering, UCC27511"
  rrect50% 1.25x0.6 smd mask+0.04: 1(-1.4,0.95) 2(-1.4,0) 3(-1.4,-0.95) 4(1.4,-0.95) 6(1.4,0.95)
  rrect50% 1.25x0.6 smd mask+0.05: 5(1.4,0)
  silkscreen extent -2.39,-1.65 0.8,1.65, body extent -1.4,-1.45 1.4,1.45, height 1.45
SOT-23_3P_SMD [mm] "SOT-23 (TO-236AB) 3-Lead, Pitch 0.95mm, Body 2.9x1.3mm, IPC-7351 Nominal"
  rrect25% 1x0.8 smd paste+0 mask+0.05: 1(-0.95,-1) 2(0.95,-1) 3(0,1)
  silkscreen extent -1.45,-0.65 1.45,0.65, body extent -1.52,-1.3 1.52,1.3, height 1.3
TNT_SW_SLIDE_2.5mm [mm] "Slide Switch SPDT (1P2T), Vertical, Body 8.5x3.7x3.5mm, Metric Pitch 2.50mm, Travel 2.0mm, Extended Oval Pads (1.70x2.40mm) for Manual Soldering, SS12D00"
  round 1.6 hole 1 mask+0.05: 2(0,0) 3(2.5,0)
  silkscreen extent -1.83,-1.98 4.45,1.55
TO-247-4_WOLFSPEED_SLOTTED_VERT [mm] "TO-247 4-Lead Package, Pitch 5.08-2.54-2.54mm, Plated Slots (1.33x2.01mm), Dedicated Kelvin Source, Wolfspeed C3M0075120K / C3M Series"
  rrect50% 1.84x3.46 hole 1.33 slot 2.01 at 0 deg mask+0.05: 1(-5.08,0) 2(0,0) 3(2.54,0) 4(5.08,0)
  silkscreen extent -8.15,-2.7 8.15,2.7, body extent -7.97,-2.51 7.97,2.51, height 22.61
TO-252-2L_DPAK_THERMAL#1 [mm] "TO-252-2L (DPAK), 2.28mm Pitch, Tab Drain with 3x3 Thermal Vias Array (0.6/0.3mm), Alpha & Omega AOD4185"
  rect 1.2x2.6 smd mask+0.05: 1(-2.29,-4.05) 3(2.29,-4.05)
  rect 5.9x5.7 smd mask+0.05: 2(0,2.5)
  silkscreen extent -4.12,-4.12 3.21,3.74, body extent -3.3,-5.02 3.3,5.02, height 2.4
TO-252-2L_DPAK_THERMAL#2 [mm] "TO-252-2L (DPAK), 2.28mm Pitch, Tab Drain with 3x3 Thermal Vias Array (0.6/0.3mm), Alpha & Omega AOD4185"
  rect 1.2x2.6 smd mask+0.05: 1(-2.29,-4.05) 3(2.29,-4.05)
  round 0.6 hole 0.3 mask+0.05: 2(-1.5,3.4) 2(-1.5,2.4) 2(-1.5,1.4) 2(0,3.4) 2(0,2.4) 2(0,1.4) 2(1.5,3.4) 2(1.5,2.4) 2(1.5,1.4)
  rect 5.9x5.7 smd mask+0.05: 2(0,2.5)
  silkscreen extent -3.34,-6.42 3.21,3.74, body extent -3.3,-5.02 3.3,5.02, height 2.4
TRANS_AUTOTRANS_T2_EPCOS_R20_N87 [mm] "Pulse Transformer T2, Epcos B64290L0632X087 (R20x10x7 N87 Toroid), Pri Braid 3mm (Pad D4.0/H2.2), Sec UL3239 28AWG, 2x Zip-Tie NPTH D3.2mm"
  rect 4x4 hole 2.2 mask+0.05: 1(-17,4)
  round 4 hole 2.2 mask+0.05: 2(-16.9,-13)
  round 2.8 hole 1.2 mask+0.05: 3(17,-11)
  round 3.2 hole 3.2 unplated mask+0.05: ""(0,-15.5) ""(0,0)
  silkscreen extent -8.85,-12.52 8.84,12.5, body extent -10,-10 10,10, height 5.5
TRANS_EFD20_CORETECH_BH-EFD20-1-8R_THT [mm] "Transformer Bobbin EFD20/10/7, CoreTech BH-EFD20-1-8R (PHL), 8-Pin THT, Row Pitch 17.5mm, Pin Pitch 5.0mm, Dedicated 15mm HV Secondary Spacing (Pins 8-5)"
  rect 2.2x2.2 hole 1 mask+0.05: 1(-8.75,7.5)
  round 2.2 hole 1 mask+0.05: 2(-8.75,2.5) 3(-8.75,-2.5) 5(8.75,7.5) 8(8.75,-7.5) ""(-8.75,-7.5) ""(8.75,-2.5) ""(8.75,2.5)
  silkscreen extent -10.2,-10.2 10.2,11.4, body extent -10.09,-10.02 9.92,9.98, height 9.9

## Part data
C1 C6 C7 C9 C10 C17 C18 C26 C28 C30 C31: library part CAP_0603_100nF_50V_X7R, "Capacitor MLCC, Ceramic, 100 nF, 50 V, ±10%, X7R, SMD 0603, Samsung Electro-Mechanics", Part Number=CL10B104KB8NNNC
C2: library part CAP_POLY_SMD_100uF_16V_D6.3, "Capacitor Polymer Aluminum, 100 uF, 16 V, ±20%, Low ESR, SMD Can 6.3x5.8 mm, Panasonic OS-CON / Nichicon"
C3 C4 C5: library part CAP_1210_22uF_25V_X7R, "Capacitor MLCC, Ceramic, 22 uF, 25 V, ±10%, X7R, SMD 1210, Murata Electronics"
C8 C25 C27 C32: library part CAP_0805_10uF_16V_X7R, "Capacitor MLCC, Ceramic, 10 uF, 16 V, ±10%, X7R, SMD 0805, Hitano Enterprise", Part Number=0805B106K160NT
C11 C24 C29: library part CAP_0805_2.2uF_25V_X7R, "Capacitor MLCC, Ceramic, 2.2 uF, 25 V, ±10%, X7R, SMD 0805, Hitano Enterprise"
C12 C14: library part CAP_1206_2.2nF_100V_C0G, "Capacitor MLCC, Ceramic, 2.2 nF, 100 V, ±5%, C0G/NP0, SMD 1206, High Frequency Snubber, Yageo"
C13: library part CAP_FILM_CBB22_220nF_630V_P15, "Capacitor Film, Metallized Polypropylene (MKP/CBB22), 0.22 uF (220 nF), 630 VDC, ±5%, Radial THT, Pitch 15.0mm, ZVS Primary Tank"
C15: library part CAP_0805_4.7uF_16V_X7R, "Capacitor MLCC, Ceramic, 4.7 uF, 16 V, ±10%, X7R, SMD 0805, Bypass / Decoupling, Samsung / Murata"
C16: library part CAP_0603_1nF_50V_NP0, "Capacitor MLCC, Ceramic, 1 nF, 50 V, ±5%, C0G/NP0, SMD 0603, High Frequency Filter, Samsung Electro-Mechanics"
C19 C20: library part CAP_FILM_CBB81_1nF_2000V, "Capacitor Film, Metallized Polypropylene (PP), 1nF, 2000 VDC (2 kV), ±5%, Radial THT, High Pulse / Snubber, CBB81"
C21: library part CAP_FILM_CBB81_470pF_2000V, "Capacitor Film, Polypropylene (PP), 470 pF, 2000 VDC, ±5%, Radial THT, Pitch 15mm, CBB81"
C22: library part CAP_FILM_CBB81_330pF_2000V, "Capacitor Film, Polypropylene (PP), 330 pF, 2000 VDC, ±5%, Radial THT, Pitch 15mm, CBB81"
C23: library part CAP_FILM_CBB81_3.2nF_2000V, "Capacitor Film, Metallized Polypropylene (PP), 3.2 nF (3.3 nF), 2000 VDC (2 kV), ±5%, Radial THT, High Pulse / Resonant Tank, CBB81"
D1 D6 D18: library part DIODE_SCHOTTKY_1N5819HW, "Schottky Barrier Diode, 40V, 1A, Vf=0.45V @ 1A, SOD-123"
D2 D5: library part DIODE_TVS_SMC_1.5SMC39AQ, "TVS Diode Unidirectional, 33.3V Vwm, 1500W (10/1000us), DO-214AB (SMC), Automotive Qualified"
D3 D7: library part DIODE_ZENER_BZX84-C15_SOT23, "Zener Diode, 15V, 250mW, ±5%, SOT-23 (TO-236AB), Gate Protection, Nexperia / NXP"
D4: library part DIODE_ARRAY_BAT54C_SOT23, "Dual Schottky Barrier Diode, Common Cathode, 30V, 200mA, Vf=0.32V @ 2mA, SOT-23"
D8 D9 D10 D11 D12 D13 D14 D15: library part DIODE_ULTRAFAST_US2M_SMA, "Ultrafast High Voltage Surface Mount Rectifier, 1000V, 2A, trr=75ns, Vf=1.7V, SMA (DO-214AC)"
D16: library part DIODE_SIC_C4D02120E_TO252, "SiC Schottky Diode, 1200V, 2A, Zero Recovery, TO-252-2 (DPAK), Pin 1: Anode, Pin 2: Cathode (Tab)"
D17: library part DIODE_SCHOTTKY_BAT54S_SOT23, "Schottky Barrier Diode Pair, 30V 200mA, Dual Series Array, SOT-23 (Pin 1: A1, Pin 2: K2, Pin 3: Common)"
DD1: library part IC_DRIVER_UCC27524DR, "Dual 5A High-Speed Low-Side Gate Driver, 4.5V to 18V VDD, Non-Inverting, SOIC-8, Texas Instruments"
DS1: "Fast monochrome screen (with a resolution of 128x64 pixels that is connected via a  seven-wire bus"
ENC: library part ENC_EC11_THT_SW, "Rotary Encoder Incremental, 2-Bit Quadrature, with Push-Button Switch, 20 PPR, Through-Hole (THT), D-Shaft 20mm, Alps Alpine / Generic"
F1: library part FUSE_MINI_BLADE_20A, "Automotive Fuse Mini Blade, 20A, 32V DC, Fast-Acting, with PCB Holder/Clips"
L1: library part IND_SMD_22uH_12A, "Inductor Power Shielded SMD, 22 uH, ±20%, 12A Irms, Ferrite Core, 13.5x12.5x6.2, SRP1265A-220M"
NT: library part NET_TIE_SMD
Q1: library part MOSFET_P-CH_AOD4185, "MOSFET P-Channel, -40V, -40A, 20 mOhm @ -10V, TO-252-2L (DPAK), Alpha & Omega Semiconductor"
Q2 Q3: library part MOSFET_N_60V_CSD18534Q5A, "MOSFET N-Channel, 60V, 69A, 3.5 mOhm, Logic Level, SON-8 (DFN 5x6), Texas Instruments"
Q4: library part MOSFET_N-CH_C3M0075120K_TO247-4, "SiC Power MOSFET N-CH, 1200V, 30A, 75 mOhm, Kelvin Source, TO-247-4, Wolfspeed / Cree"
Q5: library part MOSFET_N-CH_AO3400A_SOT23, "MOSFET N-Channel, 30V, 5.7A, 28 mOhm @ 4.5V, Logic Level, SOT-23 (TO-236AB), Alpha & Omega Semiconductor"
R1: library part RES_0603_47.5k_1%, "Resistor, 47.5 kOhm, ±1%, 0.1W (1/10W), SMD 0603, Thick Film, Yageo"
R2 R3: library part RES_0603_100k_1%, "Resistor, 100 kOhm, ±1%, 0.1W (1/10W), SMD 0603, Thick Film, Yageo"
R4 R5 R12 R13 R18 R19 R44 R46: library part RES_0603_10k_1%, "Resistor, 10 kOhm, ±1%, 0.1W (1/10W), 75V, SMD 0603, Thick Film, Hitano"
R6 R7 R8 R9 R10: library part RES_0603_33R_1%, "Resistor, 33 Ohm, ±1%, 0.1W (1/10W), SMD 0603, Thick Film, Yageo", Manufacturer=Yageo, Part Number=RC0603FR-0733RL
R11 R17: library part RES_1206_5.62R_1%, "Resistor, 5.62 Ohm, ±1%, 0.25W (1/4W), 200V, SMD 1206, Thick Film, Panasonic"
R14 R16 R42 R48: library part RES_0603_4R7, "Resistor, 4.7 Ohm, ±5%, 0.1W (1/10W), 50V, SMD 0603, Gate Drive Series, KOME"
R15 R20 R43: library part RES_0603_1k_1%, "Resistor, 1 kOhm, ±1%, 0.1W (1/10W), 75V, SMD 0603, Thick Film, Yageo"
R21: library part RES_0805_300R_1%, "Resistor, 300 Ohm, ±1%, 0.125W (1/8W), 150V, SMD 0805, Thick Film, Yageo"
R22: library part RES_0603_3.9k_1%, "Resistor, 3.9 kOhm, ±1%, 0.1W (1/10W), 75V, SMD 0603, Thick Film, Yageo"
R23 R24 R25 R26: library part RES_1206_510k_1%, "Resistor, 510 kOhm, ±1%, 0.25W (1/4W), 200V, SMD 1206, High Voltage Divider, Thick Film, Yageo"
R27 R28 R29 R30 R31: library part RES_1206_3.9M_5%, "Resistor, 3.9 MOhm, ±5%, 0.25W (1/4W), 200V, SMD 1206, Bleeder / High Resistance, Thick Film, Hitano"
R32 R33 R36 R37 R40 R41: library part RES_2512_12R_1W_5%, "Resistor, 12 Ohm, ±5%, 1W, 200V, SMD 2512, High Power Pulse Snubber, Thick Film, UniOhm / Yageo"
R34 R35 R38 R39: library part RES_1206_4.7k_1%, "Resistor, 4.7 kOhm, ±1%, 0.25W (1/4W), 200V, SMD 1206, Thick Film, Hitano"
R45 R47: library part RES_0805_110R_0.1%, "Resistor Thin Film, 110 Ohm, ±0.1%, 0.125W (1/8W), 150V, SMD 0805, High Precision Gate Resistor, Yageo"
S1: library part SW_SLIDE_SPDT_SS12D00, "Slide Switch, SPDT (1P2T), 50V DC 0.5A, Through-Hole (THT), Vertical, Actuator Height 6mm"
SOL1: library part ACTUATOR_SOLENOID_0520D_DC6V, "Miniature Micro Solenoid Air Valve, 2-Position 2-Way Normally Closed (N/C), DC 3V - 6V, Gas Cutoff, 0520D"
SW1: library part SW_PUSH_OFF-ON_PANEL, "Switch Tactile"
T1: library part TRANS_EFD20_CUSTOM, "Custom ZVS Step-Up Transformer, EFD20 Core (N87/PC40), 8-Pin Bobbin, Push-Pull Center-Tapped Primary"
T2: library part TRANS_AUTOTRANS_T2_N87, "Pulse Autotransformer, Ferrite Ring Epcos B64290-L632-X87 (N87), Pri: Braid 3.0mm (1-2T), Sec: UL3239 28AWG (10-12T)"
U1: library part MODULE_DC-DC_MP2315_3V3, "DC-DC Step-Down Buck Converter Module, MP2315, Vin 4.5V-24V, Vout 3.3V 3A, Sub-Board PCB Mount"
U2: "Arm Cortex-M4 core with DSP and FPU, 170MHz with 32Kbytes of Flash memory, Math Accelerator, Medium Analog level integration STM board"
U3: library part IC_REG_LDO_ME6211C50M5G, "LDO Voltage Regulator, Fixed 5.0V, 500mA, Low Noise, High PSRR, SOT-23-5, Microne"
U4: library part MODULE_DCDC_B0505S-1WR3, "Isolated DC-DC Converter, 5V In, 5V Out, 1W (200mA), 3000 VDC Isolation, Unregulated, SIP-4, Mornsun"
U5: library part IC_ISO_AMP_AMC1311BDWVR, "Precision Isolated Amplifier, 0V to 2V Input, 5kVrms Isolation, High CMTI (100kV/us), SOIC-8 Wide (DWV), Texas Instruments"
U6: library part MODULE_DCDC_MT3608_STEP-UP, "Miniature DC-DC Step-Up Boost Converter Module, Vin 2-24V, Vout Adj 5-28V (Preset to 15V), 2A Max, MT3608"
U7: library part IC_GATE_DRIVER_UCC27511DBVR, "Single-Channel High-Speed Low-Side Gate Driver, 4A Source / 8A Sink, Split Outputs (OUTH/OUTL), 4.5V to 18V, SOT-23-6, Texas Instruments"
U8: library part MODULE_LDO_LM78L05_SO8, "IC REG LINEAR 5V 100MA SOIC-8, Vin up to 30V"
XP1: library part CONN_XT30PW-M_2P, "Connector DC Power, XT30 Male 90° (Right Angle) PCB Mount, 2-Pin, 30A Cont. / 50A Peak, Amass XT30PW-M"

## Free pads (board coordinates)
  round 2.8 hole 1.2 mask+0: 2(207.525,28.25)

## Via types
v1: diameter 0.6, hole 0.3, Top Layer to Bottom Layer, tented both sides, 230 vias
v2: diameter 0.8, hole 0.4, Top Layer to Bottom Layer, tented both sides, 6 vias

## Nets (pads, with @x,y where several pads share a name; then routed paths per layer and width w, separated by ;. In a path a pad name is that pad's centre, name@x,y a point inside that pad or via, vN(x,y) a via of type N, cw(c..) or ccw(c..) an arc to the next point about the centre after c; other vN are vias at no path point)
+3V3: C7.1 C8.1 C18.2 C31.2 C32.2 D4.3 DS1.2 R4.2 R5.2 U1.1 U2.1 U2.2 U2.25 U2.26 U5.8 | length 182.7
  Top Layer w0.3: R4.2@9.75,36 9.75,36.025 9.5,36.275 9.475,36.275 8.8,36.95 8.326,36.95 8.15,37.126 8.15,41.665 9.805,43.32 ; U2.1@9.805,56.585 U2.2@9.805,54.06 9.805,43.32 ; R5.2@17.15,44.875 17.15,42.126 16.974,41.95 11.175,41.95 9.805,43.32 ; 17.188,42.125 18.95,42.125 18.95,44.3 19.25,44.6 v1(26.925,44.6) 28.45,46.125 31.074,46.125 31.25,46.301 31.25,51.124 31.426,51.3 41.35,51.3 v1(46.525,56.475) ; v1(26.925,38.1) D4.3@26.925,39.325
  Top Layer w0.5: DS1.2@4.175,24.135 4.527,24.135 5.112,23.55 C7.1@7.025,23.55 7.05,23.55 7.2,23.7 7.2,23.725 7.5,24.025 C8.1@8.8,24.025 ; C8.1@8.9,24.025 9.05,24.175 v1(11.475,24.175) ; R4.2@9.75,36 9.805,35.945 U2.26@9.805,33.725 ; v1(11.125,25.85) C32.2@12.55,25.85 ; v1(11.175,28.375) 12.325,28.375 C31.2@12.375,28.425 ; C18.2@92.75,55.25 92.914,55.1 ccw(c94.512,57.012) 94.512,54.52 94.514,54.52 U5.8@96.975,54.52
  PWR_SIG w1: U2.26@9.805,33.725 9.805,31.184 10.171,30.818 10.171,29.679 11.125,28.725 11.125,24.475 12.075,23.525 19.875,23.525 24.025,19.375 24.025,10.896 24.611,10.31 U1.1@26.875,10.31
  Bottom Layer w0.3: v1(26.925,38.1) v1(26.925,44.6) ; v1(46.525,56.475) 48.075,54.925 63.6,54.925 64.25,54.275 72.175,54.275 72.925,53.525 74.9,53.525 75.95,54.575 v1(94,54.575)
  other v1: 94.775,54.5
+5V_ISO_IN: C30.2 U4.2 U8.1 | length 27
  Top Layer w0.6: U8.1@70.775,53.795 71.414,53.795 71.414,53.156 71.87,52.7 C30.2@73.6,52.7 ; C30.2@73.6,52.75 90.8,52.75 92.95,50.6 92.95,47.655 U4.2@93.055,47.55